# Altium PCB slave.PcbDoc (part 5 of 7)
Units mil, origin at the board's own origin, x right, y up, seen from the top; angles counter-clockwise.
Board outline 6299.21 x 3937.01 mil, 6 copper layers (Top Copper, FUSED_VBAT-, Signal Layer 2, Signal Layer 3, VREG, Bot Copper), stack 65.355 mil thick; 495 components, 307 nets, 1435 pads, 1866 vias.
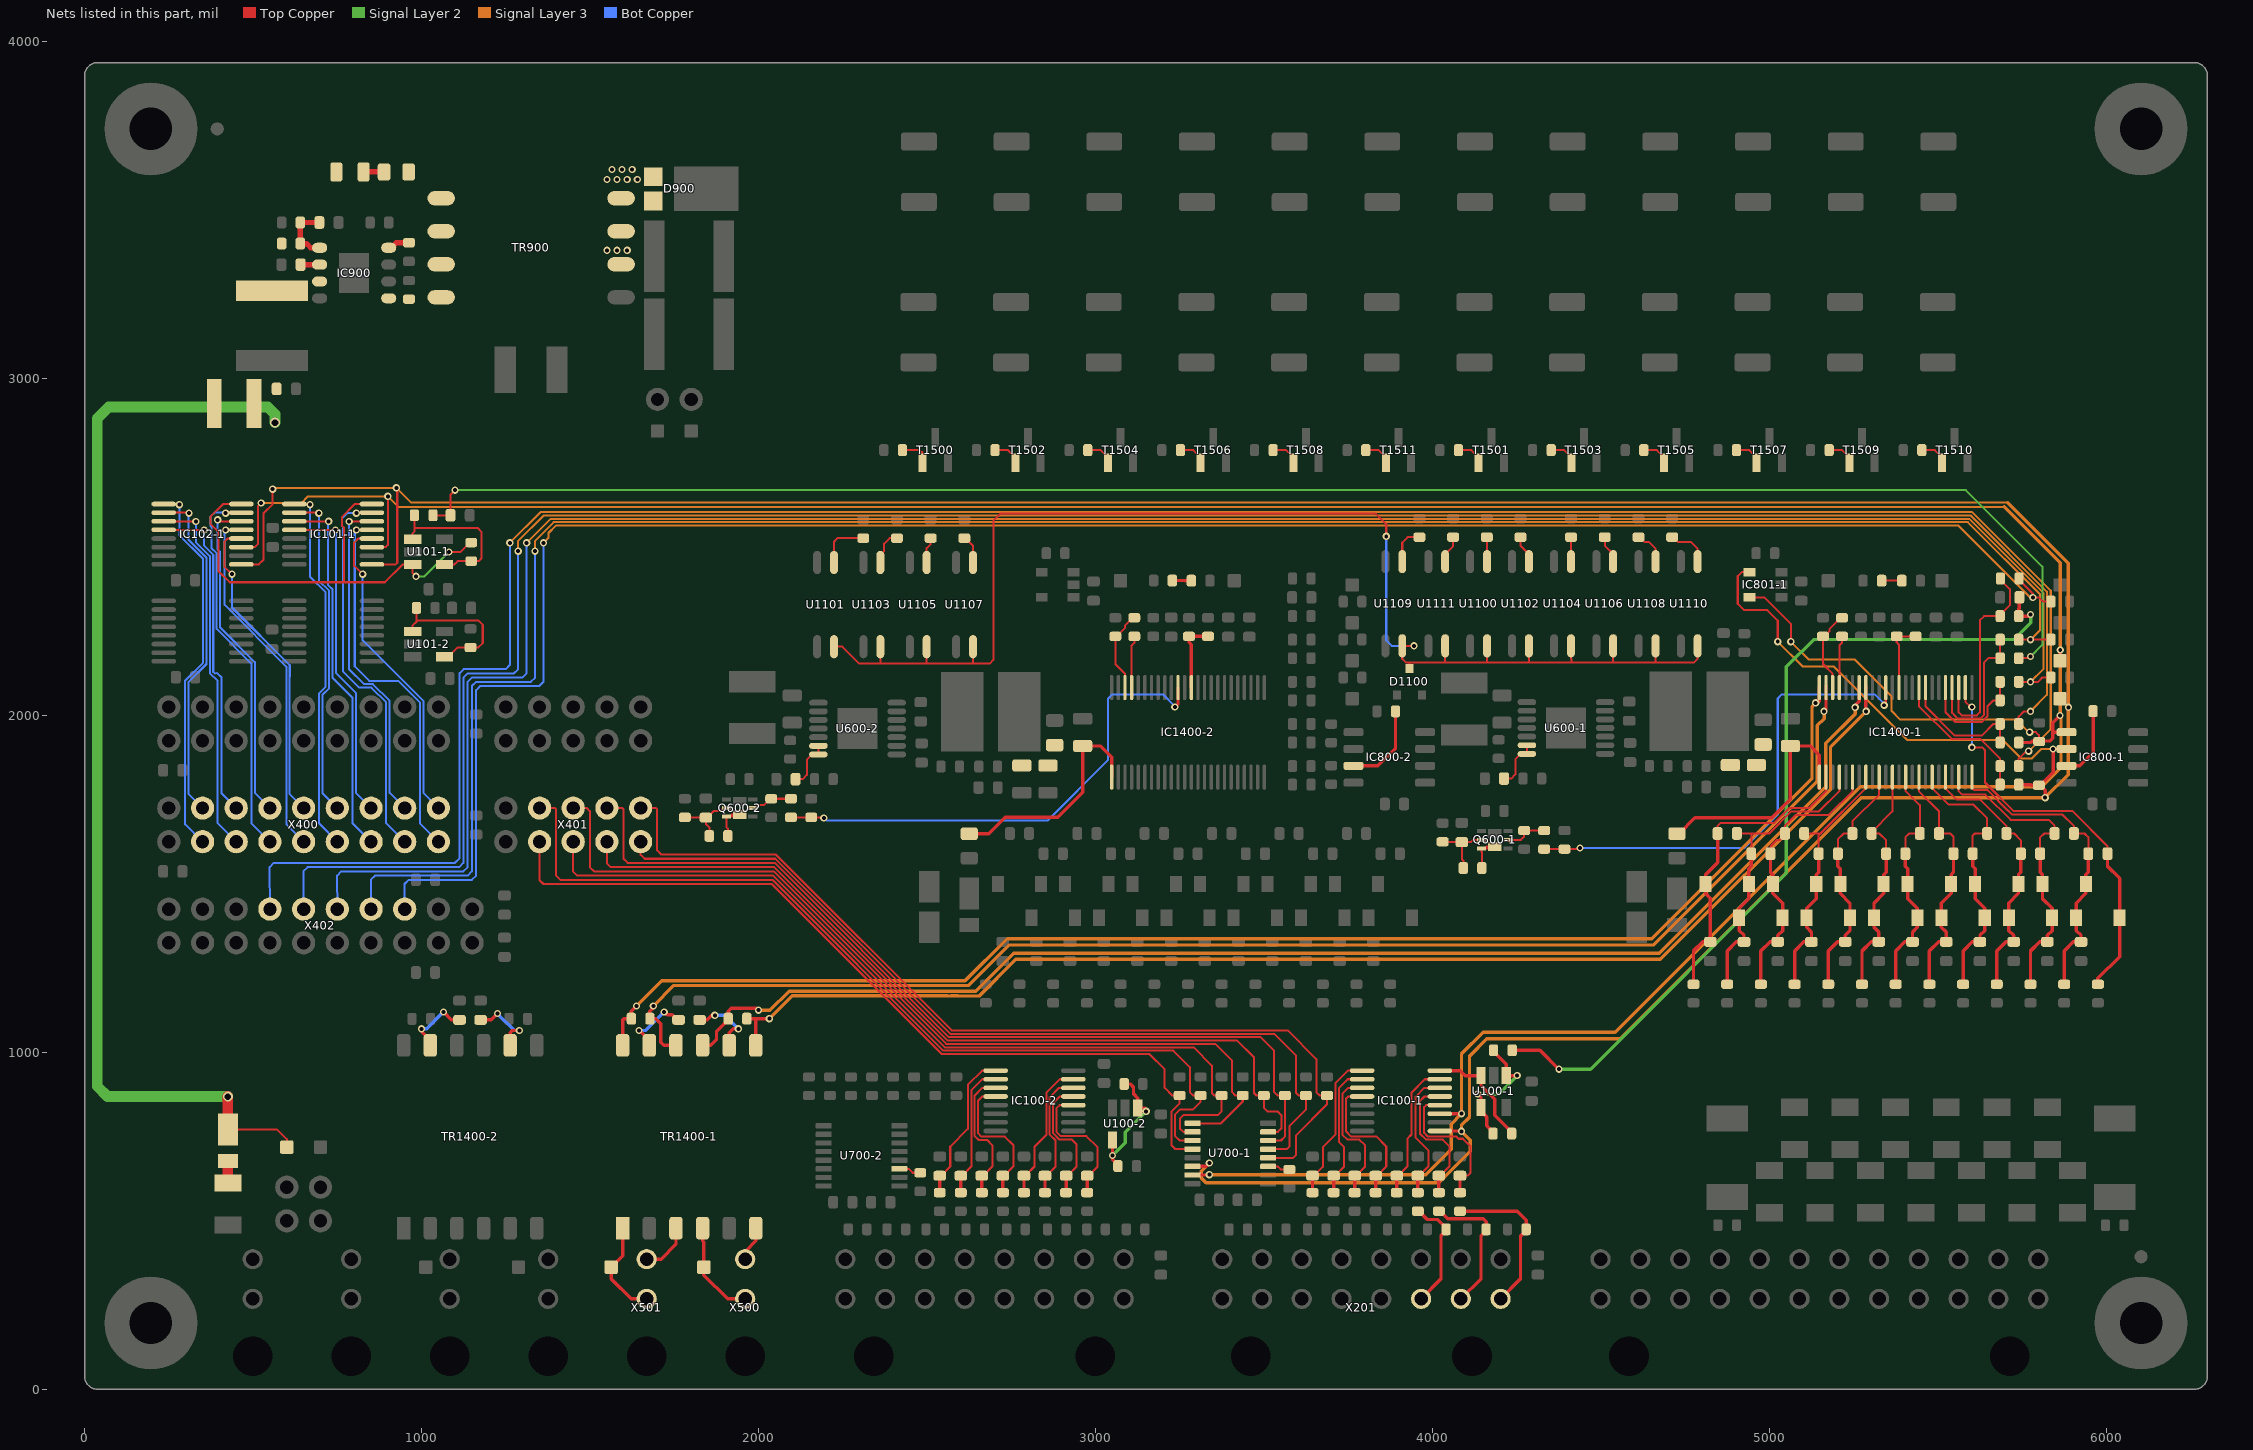
[diagram p8: the nets of this part, all layers, seen from the top]

## Via types
v1: diameter 21.65, hole 11.81, Top Copper to Bot Copper, tented both sides, 1848 vias
v2: diameter 35.43, hole 23.62, Top Copper to Bot Copper, 15 vias
v3: diameter 29.53, hole 19.68, Top Copper to Bot Copper, tented both sides, 3 vias

## Nets (pads, with @x,y where several pads share a name; then routed paths per layer and width w, separated by ;. In a path a pad name is that pad's centre, name@x,y a point inside that pad or via, vN(x,y) a via of type N, cw(c..) or ccw(c..) an arc to the next point about the centre after c; other vN are vias at no path point) (continued)
LTC-Drive_0: IC1400-1.38 R604-1.1 R605-1.2 | length 1477.9
  Top Copper w6: R604-1.1@4331.11,1603.1 4369.94,1603.1 R605-1.2@4391.66,1603.09 4434.34,1603.09 v1(4437.5,1606.25) ; v1(5340,2030) 5344.69,2034.69 IC1400-1.38@5344.69,2088.68
  Bot Copper w6: v1(4437.5,1606.25) 4924.73,1606.25 5024.21,1705.73 5024.21,2050 5036.71,2062.5 5312.5,2062.5 5340,2035 v1(5340,2030)
LTC-Drive_1: IC1400-2.38 R604-2.1 R605-2.2 | length 1483.3
  Top Copper w6: R604-2.1@2096.34,1697.44 2134.53,1697.44 R605-2.2@2156.25,1697.44 2191.93,1697.44 v1(2193.75,1695.62)
  Top Copper w10: v1(3235,2025) 3244.68,2034.68 IC1400-2.38@3244.68,2082.38
  Bot Copper w6: v1(2193.75,1695.62) 2201.87,1687.5 2857.35,1687.5 3037.5,1867.65 3037.5,2050 3050,2062.5 3200,2062.5 3235,2027.5 v1(3235,2025)
LTC-V+_0: C1400-1.1 IC1400-1.1 R1400-1.2 | length 747.5
  Top Copper w10: R1400-1.2@4725,1648.92 4731.89,1648.92 4778.59,1695.62 5005.91,1695.62 5061.71,1751.42 5061.71,1898.33 5050.88,1909.16 C1400-1.1@5061.71,1909.16 5120.84,1909.16 5147.83,1882.17 IC1400-1.1@5147.83,1816.64 IC1400-1.1@5147.83,1784.16
LTC-V+_1: C1400-2.1 IC1400-2.1 R1401-2.2 | length 683.7
  Top Copper w10: R1401-2.2@2625,1648.92 2682.63,1648.92 2731.65,1697.95 2887.67,1697.95 2961.71,1771.99 C1400-2.1@2961.71,1909.16 3014.1,1909.16 3047.83,1875.43 IC1400-2.1@3047.83,1816.64
NetC102-1_2: C102-1.2 IC100-1.4 R108-1.1 | length 443.1
  Top Copper w6: IC100-1.4@4021.41,843.45 3980.99,843.45 3975,837.46 3975,760.83 3984.94,750.89 4069.45,750.89 4076.69,743.64 4090.11,743.64 4112.5,721.25 4112.5,642.51 4103.95,633.96 C102-1.2@4081.25,633.96
  Top Copper w10: R108-1.1@4081.25,583.81 C102-1.2@4081.25,633.96
NetC102-2_2: C102-2.2 IC100-2.4 R108-2.1 | length 414.5
  Top Copper w6: IC100-2.4@2933.91,843.45 2893.49,843.45 2883.87,833.83 2883.87,764.21 2896.6,751.48 2972.66,751.48 3006.25,717.89 3006.25,661.27 2978.94,633.96 C102-2.2@2975,633.96
  Top Copper w10: R108-2.1@2975,583.81 C102-2.2@2975,633.96
NetC103-1_2: C103-1.2 IC100-1.5 R109-1.1 | length 416.9
  Top Copper w6: IC100-1.5@4021.41,869.05 3975.91,869.05 3962.5,855.64 3962.5,759.18 3980.8,740.89 4030.42,740.89 4050,721.31 4050,661.27 C103-1.2@4022.69,633.96
  Top Copper w10: R109-1.1@4018.75,583.81 C103-1.2@4018.75,633.96 C103-1.2@4022.69,633.96
NetC103-2_2: C103-2.2 IC100-2.5 R109-2.1 | length 399.4
  Top Copper w6: C103-2.2@2912.5,633.96 2916.44,633.96 2943.41,660.93 2943.41,727.58 2929.51,741.48 2892.46,741.48 2873.87,760.06 2873.87,849.42 2893.49,869.05 IC100-2.5@2933.91,869.05
  Top Copper w10: R109-2.1@2912.5,583.81 C103-2.2@2912.5,633.96
NetC104-1_2: C104-1.2 IC100-1.6 R110-1.1 | length 397.9
  Top Copper w6: C104-1.2@3960.19,633.96 3987.5,661.27 3987.5,709.42 3950,746.92 3950,868.81 3975.83,894.64 IC100-1.6@4021.41,894.64
  Top Copper w10: R110-1.1@3956.25,583.81 C104-1.2@3956.25,633.96 C104-1.2@3960.19,633.96
NetC104-2_2: C104-2.2 IC100-2.6 R110-2.1 | length 387.2
  Top Copper w6: C104-2.2@2850,633.96 2853.94,633.96 2881.25,661.27 2881.25,738.54 2863.87,755.92 2863.87,867.16 2891.34,894.64 IC100-2.6@2933.91,894.64
  Top Copper w10: R110-2.1@2850,583.81 C104-2.2@2850,633.96
NetC105-1_2: C105-1.2 IC100-1.7 R111-1.1 | length 417.6
  Top Copper w6: C105-1.2@3897.69,633.96 3925,661.27 3925,743.75 3937.5,756.25 3937.5,880.76 3976.97,920.23 IC100-1.7@4021.41,920.23
  Top Copper w10: R111-1.1@3893.75,583.81 C105-1.2@3893.75,633.96 C105-1.2@3897.69,633.96
NetC105-2_2: C105-2.2 IC100-2.7 R111-2.1 | length 422.7
  Top Copper w6: C105-2.2@2787.5,633.96 2791.44,633.96 2818.75,661.27 2818.75,719.64 2853.87,754.75 2853.87,880 2894.09,920.23 IC100-2.7@2933.91,920.23
  Top Copper w10: R111-2.1@2787.5,583.81 C105-2.2@2787.5,633.96
NetC106-1_2: C106-1.2 IC100-1.12 R112-1.1 | length 437.4
  Top Copper w6: IC100-1.12@3791.09,869.05 3750.3,869.05 3743.14,861.89 3743.14,765.47 3757.72,750.89 3832.32,750.89 3862.5,720.71 3862.5,661.27 C106-1.2@3835.19,633.96
  Top Copper w10: R112-1.1@3831.25,583.81 C106-1.2@3831.25,633.96 C106-1.2@3835.19,633.96
NetC106-2_2: C106-2.2 IC100-2.12 R112-2.1 | length 430.2
  Top Copper w6: IC100-2.12@2703.59,869.05 2663.18,869.05 2651.25,857.12 2651.25,760.23 2661.32,750.16 2731.09,750.16 2756.25,725 2756.25,661.27 2728.94,633.96 C106-2.2@2725,633.96
  Top Copper w10: R112-2.1@2725,583.81 C106-2.2@2725,633.96
NetC107-1_2: C107-1.2 IC100-1.11 R113-1.1 | length 422.8
  Top Copper w6: C107-1.2@3772.69,633.96 3800,661.27 3800,723.81 3782.92,740.89 3747.71,740.89 3732.5,756.09 3732.5,876.86 3750.27,894.64 IC100-1.11@3791.09,894.64
  Top Copper w10: R113-1.1@3768.75,583.81 C107-1.2@3768.75,633.96 C107-1.2@3772.69,633.96
NetC107-2_2: C107-2.2 IC100-2.11 R113-2.1 | length 411.6
  Top Copper w6: C107-2.2@2662.5,633.96 2666.44,633.96 2693.75,661.27 2693.75,724.11 2677.7,740.16 2652.57,740.16 2641.25,751.48 2641.25,871.94 2663.94,894.64 IC100-2.11@2703.59,894.64
  Top Copper w10: R113-2.1@2662.5,583.81 C107-2.2@2662.5,633.96
NetC108-1_2: C108-1.2 IC100-1.10 R114-1.1 | length 411.5
  Top Copper w6: C108-1.2@3710.19,633.96 3737.5,661.27 3737.5,718.75 3722.5,733.75 3722.5,894.74 3747.98,920.23 IC100-1.10@3791.09,920.23
  Top Copper w10: R114-1.1@3706.25,583.81 C108-1.2@3706.25,633.96 C108-1.2@3710.19,633.96
NetC108-2_2: C108-2.2 IC100-2.10 R114-2.1 | length 404.8
  Top Copper w6: C108-2.2@2600,633.96 2603.94,633.96 2631.25,661.27 2631.25,887.5 2663.98,920.23 IC100-2.10@2703.59,920.23
  Top Copper w10: R114-2.1@2600,583.81 C108-2.2@2600,633.96
NetC109-1_2: C109-1.2 IC100-1.9 R115-1.1 | length 450.3
  Top Copper w6: C109-1.2@3647.69,633.96 3674.21,660.48 3674.21,718.75 3712.5,757.04 3712.5,909.74 3748.57,945.82 IC100-1.9@3791.09,945.82
  Top Copper w10: R115-1.1@3643.75,583.81 C109-1.2@3643.75,633.96 C109-1.2@3647.69,633.96
NetC109-2_2: C109-2.2 IC100-2.9 R115-2.1 | length 456.8
  Top Copper w6: C109-2.2@2537.5,633.96 2541.44,633.96 2568.75,661.27 2568.75,720.23 2621.25,772.73 2621.25,903.98 2663.09,945.82 IC100-2.9@2703.59,945.82
  Top Copper w10: R115-2.1@2537.5,583.81 C109-2.2@2537.5,633.96
NetC600-1_2: C600-1.2 Q600-1.5 R600-1.1 R602-1.2 | length 197.4
  Top Copper w6: R600-1.1@4029.81,1624.9 4062.95,1624.9 4063.94,1623.92 C600-1.2@4086.64,1623.92 ; R602-1.2@4091.05,1546.91 4091.05,1568.62 4086.64,1573.04 C600-1.2@4086.64,1623.92 ; Q600-1.5@4145.18,1630.65 4120.38,1630.65 4113.64,1623.92 C600-1.2@4086.64,1623.92
NetC600-2_2: C600-2.2 Q600-2.5 R600-2.1 R602-2.2 | length 194
  Top Copper w6: R600-2.1@1781.25,1697.44 1820.07,1697.44 1821.05,1696.46 C600-2.2@1843.75,1696.46 ; R602-2.2@1853.69,1642.17 1853.69,1667.75 1843.75,1677.69 C600-2.2@1843.75,1696.46 ; Q600-2.5@1904.57,1725 1896.7,1725 1887.97,1716.26 1867.49,1716.26 1847.69,1696.46 C600-2.2@1843.75,1696.46
NetC604-1_1: C604-1.1 U600-1.6 U600-1.7 | length 150.1
  Top Copper w6: C604-1.1@4212.02,1812.47 4232.89,1812.47 4245.39,1824.97 4245.39,1869.95 4261.13,1885.7 U600-1.7@4279.83,1885.7 U600-1.6@4279.83,1911.29
NetC604-2_1: C604-2.1 U600-2.6 U600-2.7 | length 150.1
  Top Copper w6: C604-2.1@2109.69,1810.73 2130.56,1810.73 2143.06,1823.23 2143.06,1868.21 2158.81,1883.96 U600-2.7@2177.51,1883.96 U600-2.6@2177.51,1909.55
NetC607-1_2: C607-1.2 C608-1.2 R607-1.2
NetC607-2_2: C607-2.2 C608-2.2 R607-2.2
NetC902_1: C902.1 R900.2 | length 60.7
  Top Copper w16: C902.1@827.85,3612.5 R900.2@888.58,3612.5
NetC902_2: C902.2 C905.2 IC900.3 L900.2 R901.2 TR900.3 TR900.4
NetC904_1: C904.1 D901.2 L900.1 TP901.1 | length 3265.8
  Top Copper w6: D901.2@425,770.96 571.47,770.96 600,742.43 TP901.1@600,718.75
  Top Copper w32: D901.2@425,770.96 v3(425,868.75)
  Signal Layer 2 w32: v3(425,868.75) 68.26,868.75 37.5,899.51 37.5,2881.25 71.6,2915.35 543.4,2915.35 565,2893.75 v3(565,2868.75)
NetC906_2: C906.2 IC900.1 R901.1 R905.2 | length 181.6
  Top Copper w16: C906.2@696.46,3462.5 R905.2@640.06,3462.5 640.06,3421.72 R901.1@640.06,3400 658.58,3400 671.08,3387.5 IC900.1@697.58,3387.5
NetC907_2: C907.2 IC900.2 | length 56.5
  Top Copper w16: C907.2@641.04,3337.5 IC900.2@697.58,3337.5
NetC1404-1_2: C1404-1.2 TR1400-1.8 | length 206.8
  Top Copper w10: C1404-1.2@1825,1096.46 1847.7,1096.46 1861.24,1110 v1(1870,1110) ; TR1400-1.8@1912.9,1020.85 1912.9,1058.6 1924.3,1070 v1(1940,1070)
  Bot Copper w10: v1(1870,1110) 1900,1110 v1(1940,1070)
NetC1404-2_2: C1404-2.2 TR1400-2.8 | length 210.9
  Top Copper w10: C1404-2.2@1175,1096.46 1206.46,1096.46 v1(1225,1115) ; TR1400-2.8@1262.9,1020.85 1262.9,1058.6 1269.3,1065 v1(1290,1065)
  Bot Copper w10: v1(1225,1115) 1275,1065 v1(1290,1065)
NetC1405-1_2: C1405-1.2 TR1400-1.11 | length 207.3
  Top Copper w10: v1(1645,1065) 1645.5,1065 1675.9,1034.6 TR1400-1.11@1675.9,1020.85 ; v1(1720,1120) 1728.11,1111.89 1743.13,1111.89 1758.56,1096.46 C1405-1.2@1762.5,1096.46
  Bot Copper w10: v1(1645,1065) 1665,1065 v1(1720,1120)
NetC1405-2_2: C1405-2.2 TR1400-2.11 | length 202.8
  Top Copper w10: v1(1000,1070) 1000,1060.5 1025.9,1034.6 TR1400-2.11@1025.9,1020.85 ; v1(1065,1120) 1088.54,1096.46 C1405-2.2@1112.5,1096.46
  Bot Copper w10: v1(1000,1070) 1015,1070 v1(1065,1120)
NetD900_2: D900.2 D900.3 TR900.5
  other v1: 1550,3590 1580,3590 1610,3590 1640,3590 1565,3620 1595,3620 1625,3620
NetD901_1: D901.1 F900.2 | length 64.9
  Top Copper w32: F900.2@425,612.6 D901.1@425,677.46
NetD1100_3: D1100.3 U1100.4 U1101.4 U1102.4 U1103.4 U1104.4 U1105.4 U1106.4 U1107.4 U1108.4 U1109.4 U1110.4 U1111.4 | length 4001
  Top Copper w6: U1101.4@2223.81,2203.71 2248.32,2203.71 2298.32,2153.71 2361.31,2153.71 ; U1103.4@2361.31,2203.71 2361.31,2153.71 ; U1105.4@2498.81,2203.71 2498.81,2153.71 ; U1107.4@2636.31,2203.71 2636.31,2153.71 ; v1(3862.5,2531.25) 3862.5,2567.5 3831.28,2598.72 2717.86,2598.72 2696.71,2577.57 2696.71,2164.9 2685.52,2153.71 2636.31,2153.71 ; D1100.3@3931.25,2138.88 3931.25,2156.25 ; 3931.25,2156.66 3931.25,2156.25 ; v1(3944.89,2206.25) U1109.4@3910,2206.25 3910,2167.8 3921.55,2156.25 3931.25,2156.25 ; U1111.4@4037.5,2206.25 4037.5,2156.25 ; U1100.4@4161.71,2206.25 4161.71,2157.04 4162.5,2156.25 ; U1102.4@4285.92,2206.25 4285.92,2157.83 4287.5,2156.25 ; U1104.4@4410.83,2206.25 4410.83,2167.8 4412.5,2166.13 4412.5,2156.25 ; U1106.4@4535.92,2206.25 4535.92,2157.83 4537.5,2156.25 ; U1108.4@4661.71,2206.25 4661.71,2157.04 4662.5,2156.25 ; U1110.4@4786.61,2206.25 4786.61,2167.8 4775.06,2156.25 4662.5,2156.25 ; 2361.31,2153.71 2498.81,2153.71 ; 2498.81,2153.71 2636.31,2153.71 ; 3931.25,2156.25 3975,2156.25 4037.5,2156.25 ; 4037.5,2156.25 4162.5,2156.25 ; 4162.5,2156.25 4287.5,2156.25 ; 4287.5,2156.25 4412.5,2156.25 ; 4412.5,2156.25 4537.5,2156.25 ; 4537.5,2156.25 4662.5,2156.25
  Bot Copper w6: v1(3862.5,2531.25) 3862.5,2222.4 3878.65,2206.25 v1(3944.89,2206.25)
NetIC800-1_7: IC800-1.7 R800-1.1 | length 217.8
  Top Copper w10: IC800-1.7@5881.2,1850 5920,1850 5959.94,1889.94 R800-1.1@5959.94,2012.5
NetIC800-2_7: IC800-2.7 R800-2.1 | length 255.9
  Top Copper w10: IC800-2.7@3765.27,1850.25 3837.75,1850.25 3890.06,1902.56 R800-2.1@3890.06,2012.01
NetIC900_5: IC900.5 R900.1 R902.2 TR900.1 TR900.2
NetIC900_8: IC900.8 R903.1 | length 66.3
  Top Copper w16: IC900.8@902.42,3387.5 909.96,3387.5 925.02,3402.56 R903.1@962.5,3402.56
NetIC1400-1_45: IC1400-1.45 R1421-1.2 | length 147.1
  Top Copper w6: IC1400-1.45@5206.89,2088.68 5206.89,2207.19 5214.84,2215.13 R1421-1.2@5214.84,2232.48
NetIC1400-2_45: IC1400-2.45 R1421-2.2 | length 147.1
  Top Copper w6: IC1400-2.45@3106.89,2088.68 3106.89,2207.19 3114.84,2215.13 R1421-2.2@3114.84,2232.48
NetLD1400-1_1: LD1400-1.1 R1407-1.2 | length 59.9
  Top Copper w6: R1407-1.2@5332.56,2399.51 LD1400-1.1@5392.44,2399.51
NetLD1400-2_1: LD1400-2.1 R1406-2.2 | length 56.8
  Top Copper w10: R1406-2.2@3227.56,2400 3265.88,2400 3266.37,2399.51 LD1400-2.1@3284.15,2399.51
NetQ600-1_2: Q600-1.2 R604-1.2 R608-1.2 | length 120.2
  Top Copper w6: Q600-1.2@4223.53,1630.65 4262.07,1630.65 4271.86,1640.44 R608-1.2@4271.86,1658.22 R604-1.2@4321.86,1658.22
NetQ600-1_6: Q600-1.6 Q600-1.7 R602-1.1 | length 113.3
  Top Copper w6: R602-1.1@4145.18,1547.39 R602-1.1@4149.42,1543.16 ; R602-1.1@4146.17,1546.91 4146.17,1594.17 4145.18,1595.16 Q600-1.6@4145.18,1605.06 4162.96,1605.06 4160.67,1607.35 4160.67,1611.36 Q600-1.7@4184.35,1611.36
NetQ600-2_2: Q600-2.2 R604-2.2 R608-2.2 | length 124.8
  Top Copper w6: Q600-2.2@1982.92,1725 1990.79,1725 1999.53,1733.73 2014.73,1733.73 2033.56,1752.56 R608-2.2@2037.5,1752.56 R604-2.2@2096.34,1752.56
NetQ600-2_6: Q600-2.6 Q600-2.7 R602-2.1 | length 107.7
  Top Copper w6: R602-2.1@1908.81,1642.17 1908.81,1663.89 1904.57,1668.12 Q600-2.6@1904.57,1699.4 1922.35,1699.4 1922.35,1703.41 1920.06,1705.7 Q600-2.7@1943.75,1705.7
NetR116-1_1: R116-1.1 R117-1.2 U100-1.1 U100-1.4 | length 398.9
  Top Copper w10: v1(4133.86,876.2) 4143.86,866.21 U100-1.4@4143.86,836.62 4143.86,824.8 4160.47,808.2 4160.47,781.82 4179.49,762.8 R117-1.2@4179.49,758.86 ; R116-1.1@4180.92,1006.25 4180.92,1002.31 4218.66,964.57 U100-1.1@4218.66,931.1 v1(4250.83,931.1)
  Signal Layer 2 w10: v1(4133.86,876.2) 4195.93,876.2 v1(4250.83,931.1)
NetR116-2_1: R116-2.1 R117-2.2 U100-2.1 U100-2.4 | length 400.2
  Top Copper w10: U100-2.4@3050.1,752.07 U100-2.4@3050.1,740.26 v1(3050.1,693.75) 3050.1,682.53 3066.19,666.44 R117-2.2@3066.19,662.5 ; R116-2.1@3084.94,906.25 3102.75,906.25 3112.5,896.5 3112.5,876.74 3124.9,864.33 U100-2.1@3124.9,834.74 3146.51,834.74 3150,831.25 v1(3150,825)
  Signal Layer 2 w10: v1(3050.1,693.75) v1(3050.1,693.75) 3087.5,731.25 3087.5,762.5 v1(3150,825)
NetR118-1_1: R118-1.1 R119-1.2 U101-1.1 U101-1.4 | length 472.7
  Top Copper w6: U101-1.1@973.42,2522.4 973.42,2540.18 978.69,2545.45 R118-1.1@978.69,2593.75 ; 979.88,2556.63 1165.94,2556.25 1178.44,2543.75 1178.44,2466.87 1169.01,2457.44 R119-1.2@1147.29,2457.44 1107.34,2457.44 1097.5,2447.6 U101-1.4@1067.91,2447.6
NetR118-2_1: R118-2.1 R119-2.2 U101-2.1 U101-2.4 | length 462.1
  Top Copper w6: U101-2.1@973.42,2249.02 973.42,2266.8 984.94,2278.31 ; R118-2.1@984.94,2318.75 984.94,2278.31 ; U101-2.4@1067.91,2174.21 1079.72,2174.21 1107.12,2201.62 R119-2.2@1145,2201.62 1168.75,2201.62 1181.53,2214.4 1181.53,2268.75 1169.03,2281.25 987.88,2281.25 984.94,2278.31
NetR708-1_2: R708-1.2 U700-1.3 | length 66.5
  Top Copper w6: U700-1.3@3512.2,661.61 3539.83,661.61 3548.88,652.56 R708-1.2@3575,652.56
NetR708-2_2: R708-2.2 U700-2.3 | length 66.8
  Top Copper w6: U700-2.3@2417.66,654.37 2445.29,654.37 2456.9,642.76 R708-2.2@2479.67,642.76
NetR1100_2: R1100.2 U1100.1 | length 72.8
  Top Copper w6: R1100.2@4160.92,2528.69 4160.92,2495.49 4161.71,2494.7 U1100.1@4161.71,2456.25
NetR1101_2: R1101.2 U1101.1 | length 152.8
  Top Copper w6: U1101.1@2223.81,2453.71 2223.81,2515.61 2233.85,2525.66 R1101.2@2310.52,2525.66
NetR1102_2: R1102.2 U1102.1 | length 82.8
  Top Copper w6: R1102.2@4260.92,2528.69 4260.92,2503.89 4285.92,2478.89 U1102.1@4285.92,2456.25
NetR1103_2: R1103.2 U1103.1 | length 105.1
  Top Copper w6: U1103.1@2361.31,2453.71 2361.31,2476.35 2372.49,2487.53 2372.49,2509.35 2388.8,2525.66 R1103.2@2410.52,2525.66
NetR1104_2: R1104.2 U1104.1 | length 72.5
  Top Copper w6: U1104.1@4410.83,2456.25 4410.83,2494.7 4410.92,2494.79 R1104.2@4410.92,2528.69
NetR1105_2: R1105.2 U1105.1 | length 76.8
  Top Copper w6: U1105.1@2498.81,2453.71 2498.81,2496.17 2510.52,2507.88 R1105.2@2510.52,2525.66
NetR1106_2: R1106.2 U1106.1 | length 82.8
  Top Copper w6: R1106.2@4510.92,2528.69 4510.92,2503.89 4535.92,2478.89 U1106.1@4535.92,2456.25
NetR1107_2: R1107.2 U1107.1 | length 84.9
  Top Copper w6: R1107.2@2610.52,2525.66 2614.45,2525.66 2636.31,2503.81 U1107.1@2636.31,2453.71
NetR1108_2: R1108.2 U1108.1 | length 103.3
  Top Copper w6: R1108.2@4610.92,2528.69 4614.86,2528.69 4629.45,2514.1 4642.31,2514.1 4661.71,2494.7 U1108.1@4661.71,2456.25
NetR1109_2: R1109.2 U1109.1 | length 114
  Top Copper w6: U1109.1@3910,2456.25 3910,2512.78 3925.91,2528.69 R1109.2@3960.92,2528.69
NetR1110_2: R1110.2 U1110.1 | length 128.2
  Top Copper w6: R1110.2@4710.92,2528.69 4714.86,2528.69 4729.45,2514.1 4767.21,2514.1 4786.61,2494.7 U1110.1@4786.61,2456.25
NetR1111_2: R1111.2 U1111.1 | length 82.1
  Top Copper w6: U1111.1@4037.5,2456.25 4037.5,2478.89 4060.92,2502.31 R1111.2@4060.92,2528.69
NetR1500_1: R1500.1 T1500.1 | length 94
  Top Copper w6: R1500.1@2426.77,2787.01 2477.99,2787.01 2483.83,2781.17 2486.81,2781.17 T1500.1@2486.81,2749.61
NetR1501_1: R1501.1 T1501.1 | length 84.8
  Top Copper w6: R1501.1@4076.77,2787.01 4115.15,2787.01 4136.81,2765.36 T1501.1@4136.81,2749.61
NetR1506_1: R1506.1 T1502.1 | length 84.8
  Top Copper w6: R1506.1@2701.77,2787.01 2740.15,2787.01 2761.81,2765.36 T1502.1@2761.81,2749.61
NetR1507_1: R1507.1 T1503.1 | length 84.8
  Top Copper w6: R1507.1@4351.77,2787.01 4390.15,2787.01 4411.81,2765.36 T1503.1@4411.81,2749.61
NetR1512_1: R1512.1 T1504.1 | length 84.8
  Top Copper w6: R1512.1@2976.77,2787.01 3015.15,2787.01 3036.81,2765.36 T1504.1@3036.81,2749.61
NetR1513_1: R1513.1 T1505.1 | length 84.8
  Top Copper w6: R1513.1@4626.77,2787.01 4665.15,2787.01 4686.81,2765.36 T1505.1@4686.81,2749.61
NetR1518_1: R1518.1 T1506.1 | length 84.8
  Top Copper w6: R1518.1@3251.77,2787.01 3290.15,2787.01 3311.81,2765.36 T1506.1@3311.81,2749.61
NetR1519_1: R1519.1 T1507.1 | length 84.8
  Top Copper w6: R1519.1@4901.77,2787.01 4940.15,2787.01 4961.81,2765.36 T1507.1@4961.81,2749.61
NetR1524_1: R1524.1 T1508.1 | length 84.8
  Top Copper w6: R1524.1@3526.77,2787.01 3565.15,2787.01 3586.81,2765.36 T1508.1@3586.81,2749.61
NetR1525_1: R1525.1 T1509.1 | length 84.8
  Top Copper w6: R1525.1@5176.77,2787.01 5215.15,2787.01 5236.81,2765.36 T1509.1@5236.81,2749.61
NetR1530_1: R1530.1 T1510.1 | length 84.8
  Top Copper w6: R1530.1@5451.77,2787.01 5490.15,2787.01 5511.81,2765.36 T1510.1@5511.81,2749.61
NetR1531_1: R1531.1 T1511.1 | length 84.8
  Top Copper w6: R1531.1@3801.77,2787.01 3840.15,2787.01 3861.81,2765.36 T1511.1@3861.81,2749.61
NetTR900_6: TR900.6 TR900.7
  other v1: 1550,3380 1580,3380 1610,3380
PRIMARY-ANALOG-IN_0: IC101-1.4 X400.1 | length 948.7
  Top Copper w6: v1(825,2418.75) 800,2443.75 800,2512.46 812.24,2524.7 IC101-1.4@852.66,2524.7
  Bot Copper w6: v1(825,2418.75) 825,2222.76 1005,2042.76 1005,1769.99 X400.1@1049.99,1725
PRIMARY-ANALOG-IN_1: IC101-1.5 X400.2 | length 1127
  Top Copper w6: v1(806.25,2550) 806.55,2550.3 IC101-1.5@852.66,2550.3
  Bot Copper w6: v1(806.25,2550) 806.25,2545.76 801.71,2541.22 801.71,2145.37 844.56,2102.52 931.1,2102.52 995,2038.62 995,1679.99 X400.2@1049.99,1625
PRIMARY-ANALOG-IN_2: IC101-1.6 X400.3 | length 1001.9
  Top Copper w6: v1(785,2575) 785.89,2575.89 IC101-1.6@852.66,2575.89
  Bot Copper w6: v1(785,2575) 784.42,2574.42 784.42,2137.65 829.56,2092.52 855.24,2092.52 905,2042.76 905,1770 X400.3@950,1725
PRIMARY-ANALOG-IN_3: IC101-1.7 X400.4 | length 1153.4
  Top Copper w6: v1(806.25,2600) 807.75,2601.5 IC101-1.7@851.5,2601.5
  Bot Copper w6: v1(806.25,2600) 779.13,2600 763.17,2584.04 763.17,2562.69 766.53,2559.34 766.53,2130.55 814.56,2082.52 851.1,2082.52 895,2038.62 895,1680 X400.4@950,1625
PRIMARY-ANALOG-IN_4: IC101-1.12 X400.5 | length 991.3
  Top Copper w6: IC101-1.12@622.34,2550.3 v1(744.7,2550.3)
  Bot Copper w6: v1(744.7,2550.3) 745.58,2549.42 745.58,2126.5 806,2066.08 806,1769 X400.5@850,1725
PRIMARY-ANALOG-IN_5: IC101-1.11 X400.6 | length 1105.8
  Top Copper w6: IC101-1.11@622.34,2575.89 v1(724.11,2575.89)
  Bot Copper w6: v1(724.11,2575.89) 722.88,2574.65 722.88,2386.27 735.58,2373.58 735.58,2111.5 795,2052.08 795,1680 X400.6@850,1625
PRIMARY-ANALOG-IN_6: IC101-1.10 X400.7 | length 986.1
  Top Copper w6: IC101-1.10@623.5,2601.5 693.5,2601.5 v1(695,2600)
  Bot Copper w6: v1(695,2600) 695,2400.01 725.58,2369.43 725.58,2080.78 706,2061.21 706,1769 X400.7@750,1725
PRIMARY-ANALOG-IN_7: IC101-1.9 X400.8 | length 1097.1
  Top Copper w6: IC101-1.9@622.34,2627.07 666.68,2627.07 v1(668.75,2625)
  Bot Copper w6: v1(668.75,2625) 668.75,2412.12 715.58,2365.29 715.58,2084.93 696,2065.35 696,1679 X400.8@750,1625
PRIMARY-ANALOG-IN_8: IC102-1.4 X400.9 | length 941.7
  Top Copper w6: v1(437.5,2418.75) 415.04,2441.21 415.04,2515 424.74,2524.7 IC102-1.4@465.16,2524.7
  Bot Copper w6: v1(437.5,2418.75) 437.5,2320.01 608.83,2148.68 608.83,2115.82 608.55,2115.54 608.55,1766.45 X400.9@650,1725
PRIMARY-ANALOG-IN_9: IC102-1.5 X400.10 | length 1070.1
  Top Copper w6: v1(418.75,2550) 424.44,2550 424.74,2550.3 IC102-1.5@465.16,2550.3
  Bot Copper w6: v1(418.75,2550) 418.75,2545.76 415.67,2542.69 415.67,2327.69 598.83,2144.54 598.83,2119.96 598.55,2119.68 598.55,1676.45 X400.10@650,1625
PRIMARY-ANALOG-IN_10: IC102-1.6 X400.11 | length 991.1
  Top Copper w6: v1(395,2580) 399.11,2575.89 IC102-1.6@465.16,2575.89
  Bot Copper w6: v1(395,2580) 395,2491.58 401.83,2484.75 401.83,2261.06 505,2157.88 505,1770 X400.11@550,1725
PRIMARY-ANALOG-IN_11: IC102-1.7 X400.12 | length 1134.8
  Top Copper w6: v1(418.75,2600) 420.25,2601.5 IC102-1.7@464,2601.5
  Bot Copper w6: v1(418.75,2600) 416.92,2601.83 385.96,2601.83 373.17,2589.04 373.17,2562.69 376.53,2559.34 376.53,2495.9 391.83,2480.61 391.83,2256.91 495,2153.74 495,1680 X400.12@550,1625
PRIMARY-ANALOG-IN_12: IC102-1.12 X400.13 | length 989.1
  Top Copper w6: IC102-1.12@234.84,2550.3 v1(354.7,2550.3)
  Bot Copper w6: v1(354.7,2550.3) 354.7,2503.59 381.83,2476.47 381.83,2129.39 386.71,2124.51 393.29,2124.98 406.25,2112.49 406.25,1768.75 X400.13@450,1725
PRIMARY-ANALOG-IN_13: IC102-1.11 X400.14 | length 1095.2
  Top Copper w6: IC102-1.11@234.84,2575.89 329.11,2575.89 v1(330,2575)
  Bot Copper w6: v1(330,2575) 330,2514.15 371.83,2472.33 371.83,2125.25 395,2102.08 395,1680 X400.14@450,1625
PRIMARY-ANALOG-IN_14: IC102-1.10 X400.15 | length 1011.8
  Top Copper w6: IC102-1.10@236,2601.5 308.5,2601.5 v1(310,2600)
  Bot Copper w6: v1(310,2600) 308.17,2598.17 308.17,2521.84 361.83,2468.18 361.83,2152.46 308.55,2099.19 308.55,1766.45 X400.15@350,1725
PRIMARY-ANALOG-IN_15: IC102-1.9 X400.16 | length 1119.9
  Top Copper w6: IC102-1.9@234.84,2627.07 275.26,2627.07 277.33,2625 v1(281.25,2625)
  Bot Copper w6: v1(281.25,2625) 281.25,2534.62 351.83,2464.04 351.83,2156.61 298.55,2103.33 298.55,1676.45 X400.16@350,1625
PRIMARY-C0: C1322-1.2 IC1400-1.26 R1312-1.2 Z1310-1.2 | length 1219
  Top Copper w6: IC1400-1.26@5580.9,2082.38 5580.9,2040.98 5596.89,2025 v1(5600,2025) ; v1(5600,1905) 5631.22,1905 5639.21,1897.01 5639.21,1800.79 5724.33,1715.67 5899.04,1715.67 6002.75,1611.96 C1322-1.2@6002.75,1589.51 C1322-1.2@6002.75,1574.51
  Top Copper w10: R1312-1.2@5974.21,1202.07 5974.21,1219.85 6038.58,1284.22 Z1310-1.2@6038.58,1399.51 6038.58,1515.98 6002.75,1551.81 C1322-1.2@6002.75,1574.51
  Bot Copper w6: v1(5600,1905) v1(5600,2025)
PRIMARY-C1: C1318-1.2 C1320-1.1 C1322-1.1 IC1400-1.24 R1310-1.2 Z1308-1.2 Z1310-1.1 | length 942.3
  Top Copper w6: IC1400-1.24@5600.59,1816.64 5600.59,1784.16 5606.9,1777.85 5647.15,1777.85 5707.5,1717.5 5708.36,1717.5 5720.18,1705.67 5869.29,1705.67 5902.75,1672.21 C1318-1.2@5902.75,1649.51 5934.51,1649.51 5945.67,1638.35 C1322-1.1@5945.67,1589.51
  Top Copper w10: R1310-1.2@5874.21,1202.07 5874.21,1300.75 5901.51,1328.05 C1320-1.1@5924.21,1328.05 5924.21,1346.82 5909.84,1361.19 Z1310-1.1@5909.84,1399.51 5909.84,1442.75 5938.58,1471.49 Z1308-1.2@5938.58,1499.51 5938.58,1527.53 5945.67,1534.61 C1322-1.1@5945.67,1589.51
PRIMARY-C2: C1314-1.2 C1316-1.1 C1318-1.1 IC1400-1.22 R1308-1.2 Z1306-1.2 Z1308-1.1 | length 929.5
  Top Copper w6: IC1400-1.22@5561.22,1816.64 5561.22,1775.23 5571.45,1765 5640,1765 5715,1690 5827.88,1690 5845.67,1672.21 C1318-1.1@5845.67,1649.51 5814.51,1649.51 5802.75,1637.75 C1314-1.2@5802.75,1589.51
  Top Copper w10: R1308-1.2@5774.21,1202.07 5774.21,1300.75 5801.51,1328.05 C1316-1.1@5824.21,1328.05 5824.21,1346.82 5838.58,1361.19 Z1306-1.2@5838.58,1399.51 5838.58,1427.53 5809.84,1456.27 Z1308-1.1@5809.84,1499.51 5809.84,1527.53 5802.75,1534.61 C1314-1.2@5802.75,1589.51
PRIMARY-C3: C1310-1.2 C1312-1.1 C1314-1.1 IC1400-1.20 R1306-1.2 Z1304-1.2 Z1306-1.1 | length 815.8
  Top Copper w6: IC1400-1.20@5521.85,1816.64 5521.85,1784.16 5556,1750 5624.96,1750 5702.75,1672.21 C1310-1.2@5702.75,1649.51 5725.49,1649.51 5745.67,1629.33 C1314-1.1@5745.67,1589.51
  Top Copper w10: R1306-1.2@5674.21,1202.07 5674.21,1300.75 5701.51,1328.05 C1312-1.1@5724.21,1328.05 5724.21,1346.82 5709.84,1361.19 Z1306-1.1@5709.84,1399.51 5709.84,1442.75 5738.58,1471.49 Z1304-1.2@5738.58,1499.51 5738.58,1527.53 5745.67,1534.61 C1314-1.1@5745.67,1589.51
PRIMARY-C4: C1306-1.2 C1308-1.1 C1310-1.1 IC1400-1.18 R1304-1.2 Z1302-1.2 Z1304-1.1 | length 818.9
  Top Copper w6: IC1400-1.18@5482.48,1816.64 5482.48,1784.16 5531.63,1735 5605,1735 5645.67,1694.33 C1310-1.1@5645.67,1649.51 5609.51,1649.51 5602.75,1642.75 C1306-1.2@5602.75,1589.51
  Top Copper w10: R1304-1.2@5574.21,1202.07 5574.21,1300.75 5601.51,1328.05 C1308-1.1@5624.21,1328.05 5624.21,1346.82 5638.58,1361.19 Z1302-1.2@5638.58,1399.51 5638.58,1427.53 5609.84,1456.27 Z1304-1.1@5609.84,1499.51 5609.84,1544.72 5602.75,1551.81 C1306-1.2@5602.75,1589.51
PRIMARY-C5: C1302-1.2 C1304-1.1 C1306-1.1 IC1400-1.16 R1302-1.2 Z1300-1.2 Z1302-1.1 | length 731
  Top Copper w6: IC1400-1.16@5443.11,1816.64 5443.11,1775.23 5502.75,1715.59 C1302-1.2@5502.75,1649.51 5535.49,1649.51 5545.67,1639.33 C1306-1.1@5545.67,1589.51
  Top Copper w10: R1302-1.2@5474.21,1202.07 5474.21,1300.75 5501.51,1328.05 C1304-1.1@5524.21,1328.05 5524.21,1357.12 5509.84,1371.49 Z1302-1.1@5509.84,1399.51 5509.84,1442.75 5538.58,1471.49 Z1300-1.2@5538.58,1499.51 5538.58,1527.53 5545.67,1534.61 C1306-1.1@5545.67,1589.51
PRIMARY-C6: C1300-1.1 C1302-1.1 C1323-1.2 IC1400-1.14 R1300-1.2 Z1300-1.1 Z1311-1.2 | length 722.8
  Top Copper w6: C1323-1.2@5402.75,1589.51 5402.75,1637.75 5414.51,1649.51 C1302-1.1@5445.67,1649.51 5445.67,1733.31 5403.74,1775.23 IC1400-1.14@5403.74,1816.64
  Top Copper w10: R1300-1.2@5374.21,1202.07 5374.21,1300.75 5401.51,1328.05 C1300-1.1@5424.21,1328.05 5424.21,1357.12 5438.58,1371.49 Z1311-1.2@5438.58,1399.51 5438.58,1427.53 5409.84,1456.27 Z1300-1.1@5409.84,1499.51 5409.84,1544.72 5402.75,1551.81 C1323-1.2@5402.75,1589.51
PRIMARY-C7: C1319-1.2 C1321-1.1 C1323-1.1 IC1400-1.12 R1311-1.2 Z1309-1.2 Z1311-1.1 | length 726
  Top Copper w6: C1323-1.1@5345.67,1589.51 5345.67,1629.33 5325.49,1649.51 C1319-1.2@5302.75,1649.51 5302.75,1653.45 5364.37,1715.06 IC1400-1.12@5364.37,1816.64
  Top Copper w10: R1311-1.2@5274.21,1202.07 5274.21,1300.75 5301.51,1328.05 C1321-1.1@5324.21,1328.05 5324.21,1357.12 5309.84,1371.49 Z1311-1.1@5309.84,1399.51 5309.84,1442.75 5338.58,1471.49 Z1309-1.2@5338.58,1499.51 5338.58,1527.53 5345.67,1534.61 C1323-1.1@5345.67,1589.51
PRIMARY-C8: C1315-1.2 C1317-1.1 C1319-1.1 IC1400-1.10 R1309-1.2 Z1307-1.2 Z1309-1.1 | length 735.3
  Top Copper w6: C1315-1.2@5202.75,1589.51 5202.75,1632.75 5219.51,1649.51 C1319-1.1@5245.67,1649.51 5245.67,1685.67 5325,1765 IC1400-1.10@5325,1816.64
  Top Copper w10: R1309-1.2@5174.21,1202.07 5174.21,1300.75 5201.51,1328.05 C1317-1.1@5224.21,1328.05 5224.21,1346.82 5238.58,1361.19 Z1307-1.2@5238.58,1399.51 5238.58,1442.75 5209.84,1471.49 Z1309-1.1@5209.84,1499.51 5209.84,1544.72 5202.75,1551.81 C1315-1.2@5202.75,1589.51
PRIMARY-C9: C1311-1.2 C1313-1.1 C1315-1.1 IC1400-1.8 R1307-1.2 Z1305-1.2 Z1307-1.1 | length 775.6
  Top Copper w6: C1311-1.2@5102.75,1649.51 5150.98,1649.51 ; C1315-1.1@5145.67,1589.51 5145.67,1644.2 5150.98,1649.51 ; IC1400-1.8@5285.63,1816.64 5285.63,1784.16 5150.98,1649.51
  Top Copper w10: R1307-1.2@5074.21,1202.07 5074.21,1300.75 5101.51,1328.05 C1313-1.1@5124.21,1328.05 5124.21,1357.12 5109.84,1371.49 Z1307-1.1@5109.84,1399.51 5109.84,1427.53 5138.58,1456.27 Z1305-1.2@5138.58,1499.51 5138.58,1527.53 5145.67,1534.61 C1315-1.1@5145.67,1589.51
PRIMARY-C10: C1307-1.2 C1309-1.1 C1311-1.1 IC1400-1.6 R1305-1.2 Z1303-1.2 Z1305-1.1 | length 833
  Top Copper w6: C1307-1.2@5002.75,1589.51 5002.75,1612.21 5020.69,1630.14 5030.24,1630.14 5045.67,1645.57 C1311-1.1@5045.67,1649.51 5045.67,1672.21 5078.46,1705 5176.02,1705 5246.26,1775.23 IC1400-1.6@5246.26,1816.64
  Top Copper w10: R1305-1.2@4974.21,1202.07 4974.21,1300.75 5001.51,1328.05 C1309-1.1@5024.21,1328.05 5024.21,1346.82 5038.58,1361.19 Z1303-1.2@5038.58,1399.51 5038.58,1442.75 5009.84,1471.49 Z1305-1.1@5009.84,1499.51 5009.84,1527.53 5002.75,1534.61 C1307-1.2@5002.75,1589.51
PRIMARY-C11: C1303-1.2 C1305-1.1 C1307-1.1 IC1400-1.4 R1303-1.2 Z1301-1.2 Z1303-1.1 | length 900.6
  Top Copper w6: C1303-1.2@4902.75,1649.51 4943.75,1649.51 ; C1307-1.1@4945.67,1589.51 4945.67,1647.59 4943.75,1649.51 ; IC1400-1.4@5206.89,1816.64 5206.89,1775.23 5146.65,1715 5064.21,1715 4998.72,1649.51 4943.75,1649.51
  Top Copper w10: R1303-1.2@4874.21,1202.07 4874.21,1300.75 4901.51,1328.05 C1305-1.1@4924.21,1328.05 4924.21,1346.82 4909.84,1361.19 Z1303-1.1@4909.84,1399.51 4909.84,1427.53 4938.58,1456.27 Z1301-1.2@4938.58,1499.51 4938.58,1544.72 4945.67,1551.81 C1307-1.1@4945.67,1589.51
PRIMARY-C12: C1301-1.1 C1303-1.1 IC1400-1.2 R1301-1.2 Z1301-1.1 | length 930.9
  Top Copper w6: C1303-1.1@4845.67,1649.51 4845.67,1672.21 4854.71,1681.25 5014.2,1681.25 5057.95,1725 5117.28,1725 5167.52,1775.23 IC1400-1.2@5167.52,1816.64
  Top Copper w10: R1301-1.2@4774.21,1202.07 4774.21,1300.75 4801.51,1328.05 C1301-1.1@4824.21,1328.05 4824.21,1457.12 4809.84,1471.49 Z1301-1.1@4809.84,1499.51 4809.84,1527.53 4845.67,1563.35 C1303-1.1@4845.67,1649.51
PRIMARY-DIGITAL-IO_0: R700-1.1 U700-1.4 X401.1 | length 2818.5
  Top Copper w6: X401.1@1650,1725 1695,1725 1699.21,1720.79 1699.21,1599.51 1711.71,1587.01 2051.18,1587.01 2573.19,1065 3569.6,1065 3655,979.6 3655,881.94 3664.99,871.95 R700-1.1@3686.71,871.95 3686.71,845.43 3595,753.72 3595,696.25 3585.95,687.2 U700-1.4@3512.2,687.2
PRIMARY-DIGITAL-IO_1: R701-1.1 U700-1.5 X401.2 | length 2611.3
  Top Copper w6: X401.2@1650,1625 1650,1586.22 1661.71,1574.51 2049.54,1574.51 2569.05,1055 3530,1055 3595,990 3595,879.44 3602.49,871.95 R701-1.1@3624.21,871.95 3624.21,830.21 3575.79,781.79 3575.79,721.46 3567.13,712.8 U700-1.5@3512.2,712.8
PRIMARY-DIGITAL-IO_2: R702-1.1 U700-1.6 X401.3 | length 2699.1
  Top Copper w6: X401.3@1550,1725 1595,1725 1599.21,1720.79 1599.21,1574.51 1611.71,1562.01 2047.89,1562.01 2564.9,1045 3490,1045 3530,1005 3530,881.94 3539.99,871.95 R702-1.1@3561.71,871.95 3561.71,750 3550.1,738.39 U700-1.6@3512.2,738.39
PRIMARY-DIGITAL-IO_3: R703-1.1 U700-1.7 X401.4 | length 2540.3
  Top Copper w6: X401.4@1550,1625 1550,1561.22 1561.71,1549.51 2046.25,1549.51 2560.76,1035 3419.97,1035 3470,984.97 3470,879.44 3477.49,871.95 R703-1.1@3499.21,871.95 3499.21,835.79 3510,825 3539.83,825 3551.19,813.64 3551.19,774.15 3541.01,763.98 U700-1.7@3512.2,763.98
PRIMARY-DIGITAL-IO_4: R704-1.1 U700-1.9 X401.5 | length 2685.4
  Top Copper w6: X401.5@1450,1725 1490,1725 1499.21,1715.79 1499.21,1549.51 1511.71,1537.01 2044.61,1537.01 2556.62,1025 3354.97,1025 3405,974.97 3405,881.94 3414.99,871.95 R704-1.1@3436.71,871.95 3436.71,854.17 3372.11,789.57 U700-1.9@3287.8,789.57
PRIMARY-DIGITAL-IO_5: R705-1.1 U700-1.10 X401.6 | length 2586.7
  Top Copper w6: X401.6@1450,1625 1450,1536.22 1461.71,1524.51 2042.97,1524.51 2552.48,1015 3290.87,1015 3345,960.87 3345,879.44 3352.49,871.95 R705-1.1@3374.21,871.95 3374.21,825 3363.54,814.33 3261.71,814.33 3250,802.62 3250,774.15 3260.17,763.98 U700-1.10@3287.8,763.98
PRIMARY-DIGITAL-IO_6: R706-1.1 U700-1.11 X401.7 | length 2704.2
  Top Copper w6: X401.7@1350,1725 1395,1725 1399.21,1720.79 1399.21,1524.51 1411.71,1512.01 2041.33,1512.01 2548.34,1005 3230.87,1005 3280,955.87 3280,881.94 3289.99,871.95 R706-1.1@3311.71,871.95 3311.71,853.91 3287.8,830 3250,830 3236.23,816.23 3236.23,751.48 3249.32,738.39 U700-1.11@3287.8,738.39
PRIMARY-DIGITAL-IO_7: R707-1.1 U700-1.12 X401.8 | length 2535.1
  Top Copper w6: X401.8@1350,1625 1350,1511.22 1361.71,1499.51 2039.68,1499.51 2544.19,995 3159.97,995 3205,949.97 3205,894.44 3227.49,871.95 R707-1.1@3249.21,871.95 3249.21,848.46 3225,824.25 3225,725 3237.2,712.8 U700-1.12@3287.8,712.8
PRIMARY-GPIO1: IC1400-1.27 R1405-1.2 R1406-1.2 | length 621.4
  Top Copper w6: IC1400-1.27@5561.22,2088.68 5561.22,2008.78 5570,2000 5615,2000 5624.21,2009.21 5624.21,2282.01 5636.71,2294.51 R1406-1.2@5682.19,2294.51 ; R1406-1.2@5684.15,2294.51 5684.15,2298.45 5712.8,2327.1 5712.8,2374.45 5684.94,2402.31 R1405-1.2@5684.94,2406.25
PRIMARY-GPIO1-OPT: R1404-1.1 R1405-1.1 X402.5 | length 6140.1
  Top Copper w6: R1405-1.1@5740.06,2406.25 5740.06,2402.31 5774.21,2368.16 5781.25,2361.12 v1(5781.25,2349.51) 5799.9,2349.51 5811.91,2337.5 R1404-1.1@5834.94,2337.5
  Signal Layer 3 w6: v1(1361.71,2512.01) 1376.71,2527.01 1376.71,2541.15 1398.63,2563.08 5560.64,2563.08 5774.21,2349.51 v1(5781.25,2349.51)
  Bot Copper w6: X402.5@950,1425 949.21,1499.51 961.71,1512.01 1149.21,1512.01 1161.71,1524.51 1161.71,2074.51 1174.21,2087.01 1349.21,2087.01 1361.71,2099.51 v1(1361.71,2512.01)
PRIMARY-GPIO2: IC1400-1.28 R1409-1.2 R1410-1.2 | length 449.6
  Top Copper w6: IC1400-1.28@5541.54,2088.68 5541.54,2007.19 5549.21,1999.51 5558.72,1990 5625,1990 5636.71,2001.71 5636.71,2157.01 5649.21,2169.51 R1410-1.2@5682.19,2169.51 ; R1410-1.2@5684.15,2169.51 R1409-1.2@5684.15,2224.51
PRIMARY-GPIO2-OPT: R1408-1.1 R1409-1.1 X402.7 | length 6369.1
  Top Copper w6: R1409-1.1@5741.24,2224.51 v1(5774.21,2224.51) 5774.7,2225 R1408-1.1@5834.94,2225
  Signal Layer 3 w6: v1(1336.71,2487.01) 1336.71,2517.88 1391.91,2573.08 5588.55,2573.08 5803.08,2358.55 5803.08,2253.38 v1(5774.21,2224.51)
  Bot Copper w6: X402.7@850,1425 849.21,1512.01 861.71,1524.51 1136.71,1524.51 1149.21,1537.01 1149.21,2087.01 1161.71,2099.51 1324.21,2099.51 1336.71,2112.01 v1(1336.71,2487.01)
PRIMARY-GPIO3: IC1400-1.29 R1412-1.2 R1413-1.2 | length 346
  Top Copper w6: IC1400-1.29@5521.85,2082.38 5521.85,2009.89 5551.73,1980 5629.14,1980 5646.71,1997.57 5646.71,2026.71 5664.51,2044.51 R1413-1.2@5684.15,2044.51 R1412-1.2@5684.15,2099.51
PRIMARY-GPIO3-OPT: R1411-1.1 R1412-1.1 X402.9 | length 6620.7
  Top Copper w6: R1412-1.1@5741.24,2099.51 v1(5774.21,2099.51) 5796.85,2099.51 5809.84,2112.5 R1411-1.1@5834.94,2112.5
  Signal Layer 3 w6: v1(1311.71,2512.01) 1382.78,2583.08 5592.69,2583.08 5813.08,2362.69 5813.08,2138.38 v1(5774.21,2099.51)
  Bot Copper w6: X402.9@750,1425 749.21,1524.51 761.71,1537.01 1124.21,1537.01 1136.71,1549.51 1136.71,2099.51 1149.21,2112.01 1299.21,2112.01 1311.71,2124.51 v1(1311.71,2512.01)
PRIMARY-GPIO4: IC1400-1.32 R1414-1.2 R1417-1.2 | length 382.5
  Top Copper w6: IC1400-1.32@5462.79,2082.38 5462.79,2026.34 5549.13,1940 5630,1940 5664.51,1974.51 R1414-1.2@5684.15,1974.51 R1417-1.2@5684.15,1919.51
PRIMARY-GPIO4-OPT: R1414-1.1 X402.11 | length 6800.6
  Top Copper w6: R1414-1.1@5739.27,1974.51 5739.27,1996.23 5755.05,2012.01 v1(5774.21,2012.01)
  Signal Layer 3 w6: v1(1286.71,2487.01) 1286.71,2517.88 1361.91,2593.08 5596.84,2593.08 5823.08,2366.84 5823.08,2060.88 v1(5774.21,2012.01)
  Bot Copper w6: X402.11@650,1425 649.21,1537.01 661.71,1549.51 1111.71,1549.51 1124.21,1562.01 1124.21,2112.01 1136.71,2124.51 1274.21,2124.51 1286.71,2137.01 v1(1286.71,2487.01)
PRIMARY-GPIO5: IC1400-1.33 R1418-1.2 R1420-1.2 | length 437.7
  Top Copper w6: IC1400-1.33@5443.11,2082.38 5443.11,2026.89 5540,1930 5625.38,1930 5684.15,1871.23 R1418-1.2@5684.15,1849.51 R1420-1.2@5684.15,1794.51
PRIMARY-GPIO5-OPT: R1418-1.1 X402.13 | length 7040.7
  Top Copper w6: R1418-1.1@5739.27,1849.51 5739.27,1871.23 5761.79,1893.75 v1(5768.75,1893.75)
  Signal Layer 3 w6: v1(1261.71,2512.01) 1352.78,2603.08 5600.98,2603.08 5834.33,2369.73 5834.33,1959.33 v1(5768.75,1893.75)
  Bot Copper w6: X402.13@550,1425 549.21,1549.51 561.71,1562.01 1099.21,1562.01 1112.77,1575.57 1112.77,2125.27 1124.51,2137.01 1249.21,2137.01 1261.71,2149.51 v1(1261.71,2512.01)
PRIMARY-ICMP: IC1400-1.46 R1419-1.2 R1421-1.1 | length 246.9
  Top Copper w6: IC1400-1.46@5187.2,2082.38 5187.2,2123.79 5158.59,2152.4 R1419-1.2@5158.59,2234.45 5162.53,2234.45 5177.12,2249.04 5177.12,2255.78 5210.9,2289.57 R1421-1.1@5214.84,2289.57
PRIMARY-ICMP1: IC1400-2.46 R1420-2.2 R1421-2.1 | length 246.9
  Top Copper w6: IC1400-2.46@3087.2,2082.38 3087.2,2123.79 3058.59,2152.4 R1420-2.2@3058.59,2234.45 3062.53,2234.45 3086.78,2258.7 3086.78,2265.44 3110.9,2289.57 R1421-2.1@3114.84,2289.57
PRIMARY-IN+: TP1407-1.1 TR1400-1.4 X500.1 | length 292.8
  Top Copper w10: TR1400-1.4@1833.9,478.35 1833.9,440.6 1837.5,437 TP1407-1.1@1837.5,362.5 1837.5,338.82 1907.89,268.43 X500.1@1960.13,268.43
PRIMARY-IN-: TR1400-1.6 X500.2 | length 105.1
  Top Copper w10: X500.2@1960.13,386.42 1960.13,408.83 1991.9,440.6 TR1400-1.6@1991.9,478.35
PRIMARY-IN_N1: IC1400-1.41 R1422-1.2 TR1400-1.7 | length 3930.9
  Top Copper w10: R1422-1.2@1965.06,1100 1995,1100 ; TR1400-1.7@1991.9,1020.85 1991.9,1096.9 1995,1100 ; v1(2032.01,1100) 1995,1100 ; IC1400-1.41@5285.63,2088.68 5285.63,2013.09 v1(5286.71,2012.01)
  Signal Layer 3 w10: v1(2032.01,1100) 2099.59,1167.58 2559.87,1167.58 2560.2,1167.25 2571.05,1167.25 2571.38,1167.58 2591.12,1167.58 2591.45,1167.25 2654.75,1167.25 2763.29,1275.79 4675.79,1275.79 5180.9,1780.9 5180.9,1906.2 v1(5286.71,2012.01)
PRIMARY-IN_P1: IC1400-1.42 R1422-1.1 TR1400-1.9 | length 4026.7
  Top Copper w10: TR1400-1.9@1833.9,1020.85 1857.9,1020.85 1875,1037.95 1875,1061.12 1909.94,1096.06 R1422-1.1@1909.94,1100 1909.94,1122.44 1918.75,1131.25 1993.75,1131.25 v1(2000,1125) ; v1(5254,2024) 5254,2029.3 5265.94,2041.24 IC1400-1.42@5265.94,2088.68
  Signal Layer 3 w10: v1(2000,1125) 2033.8,1125 2090.38,1181.58 2596.92,1181.58 2597.24,1181.25 2644.54,1181.25 2757.04,1293.75 4672.3,1293.75 5166.9,1788.36 5166.9,1916.9 5254,2004 v1(5254,2024)
PRIMARY-MUX-DATA_TEMP: C111-1.2 R116-1.2 R1406-1.1 | length 2573.7
  Top Copper w10: R116-1.2@4236.03,1006.25 4318.75,1006.25 v1(4375,950) ; R1406-1.1@5739.27,2294.51 5739.27,2316.23 5741.04,2318 5741.04,2337.51 C111-1.2@5741.24,2337.51 ; R1406-1.1@5741.24,2294.51 5769.21,2294.51 v1(5774.21,2299.51)
  Signal Layer 2 w10: v1(4375,950) 4468.75,950 5050,1531.25 5050,2143.75 5131.25,2225 5725,2225 5775,2275 5775,2298.72 v1(5774.21,2299.51)
PRIMARY-MUX-DATA_USER: C115-1.2 R118-1.2 R1410-1.1 | length 5252.3
  Top Copper w6: R118-1.2@1033.81,2593.75 C115-1.2@1085.77,2593.75 1085.77,2654.82 v1(1099.21,2668.26) ; R1410-1.1@5741.24,2169.51 5769.21,2169.51 v1(5774.21,2174.51)
  Signal Layer 2 w6: v1(1099.21,2668.26) 5582.1,2668.26 5809.21,2441.15 5809.21,2209.51 v1(5774.21,2174.51)
PRIMARY-OPA_TEMP: IC100-1.8 R117-1.1 U100-1.3 | length 338.4
  Top Copper w10: IC100-1.8@4021.41,945.82 4081.79,945.82 4096.5,931.1 U100-1.3@4143.86,931.1 4143.86,901.51 4184.35,861.02 4184.35,813.06 4234.61,762.8 R117-1.1@4234.61,758.86
PRIMARY-OPA_USER: IC101-1.8 IC102-1.8 R119-1.1 U101-1.3 | length 1436.6
  Top Copper w6: IC102-1.8@465.16,2627.07 411.2,2627.07 373.17,2589.04 373.17,2569.13 396.92,2545.38 396.92,2428.46 430.38,2395 770,2395 ; IC101-1.8@852.66,2627.07 802.07,2627.07 763.17,2588.17 763.17,2562.69 770,2555.87 770,2395 ; v1(983.17,2412.5) 973.42,2422.24 U101-1.3@973.42,2447.6 943.83,2447.6 891.23,2395 770,2395 ; v1(1081.25,2485) 1115.8,2485 1143.36,2512.56 R119-1.1@1147.29,2512.56
  Signal Layer 2 w6: v1(983.17,2412.5) 1008.75,2412.5 v1(1081.25,2485)
PRIMARY-OUT+: TP1406-1.1 TR1400-1.1 X501.1 | length 294.9
  Top Copper w10: TR1400-1.1@1596.9,478.35 1596.9,396.9 TP1406-1.1@1562.5,362.5 1562.5,327.5 1621.57,268.43 X501.1@1667.87,268.43
PRIMARY-OUT-: TR1400-1.3 X501.2 | length 153.4
  Top Copper w10: X501.2@1667.87,386.42 1711.22,386.42 1754.9,430.1 TR1400-1.3@1754.9,478.35
PRIMARY-OUT_N1: IC1400-1.47 R1423-1.2 TR1400-1.10 | length 4209.7
  Top Copper w10: v1(1687.5,1137.5) 1687.5,1131.66 1677.56,1121.72 R1423-1.2@1677.56,1100 1695.34,1100 1710,1085.34 1710,1030 1719.15,1020.85 TR1400-1.10@1754.9,1020.85 ; v1(5161.71,2012.01) 5167.52,2017.82 IC1400-1.47@5167.52,2088.68
  Signal Layer 3 w10: v1(1687.5,1137.5) 1748.5,1198.5 2624.21,1198.5 2744.46,1318.75 4656.25,1318.75 5141.74,1804.24 5141.74,1970.08 5161.71,1990.06 v1(5161.71,2012.01)
PRIMARY-OUT_P1: IC1400-1.48 R1423-1.1 TR1400-1.12 | length 4197.2
  Top Copper w10: TR1400-1.12@1596.9,1020.85 1596.9,1096.9 1600,1100 R1423-1.1@1622.44,1100 1622.44,1122.44 v1(1637.5,1137.5) ; v1(5136.71,2037.01) 5140.68,2040.98 5147.83,2040.98 IC1400-1.48@5147.83,2082.38
  Signal Layer 3 w10: v1(1637.5,1137.5) 1712.5,1212.5 2612.5,1212.5 2737.5,1337.5 4650,1337.5 5125.99,1813.49 5125.99,2026.29 v1(5136.71,2037.01)
PRIMARY-SCL_0: IC100-1.1 IC101-1.1 IC102-1.1 IC800-1.6 IC801-1.4 R1416-1.1 R1420-1.1 TP1405-1.1 U700-1.14 | length 11683.6
  Top Copper w6: IC102-1.1@465.16,2447.93 516.93,2447.93 531,2462 531,2599.37 558,2626.37 v1(558,2671) ; IC101-1.1@852.66,2447.93 922.93,2447.93 927.81,2452.81 927.81,2672.19 v1(925,2675) ; IC801-1.4@4940.26,2424.9 4917.67,2424.9 4905.52,2412.75 4905.52,2330.68 4924.21,2311.98 4993.48,2311.98 5024.21,2281.25 v1(5024.21,2218.75) ; TP1405-1.1@5861.71,2049.51 v1(5887.22,2024)
  Top Copper w10: U700-1.14@3287.8,661.61 3327.65,661.61 v1(3337.5,671.46) ; IC100-1.1@4021.41,766.68 4084.52,766.68 v1(4085.73,765.47) ; R1420-1.1@5739.27,1794.51 5775.42,1794.51 5777.49,1792.44 R1416-1.1@5799.21,1792.44 R1416-1.1@5803.15,1792.44 ; v1(5817.96,1755.76) 5817.74,1755.98 5817.74,1777.85 R1416-1.1@5803.15,1792.44 ; IC800-1.6@5881.2,1900 v1(5840.98,1900) 5841.56,1899.42 5841.56,1830.86 R1416-1.1@5803.15,1792.44
  Signal Layer 3 w6: v1(558,2671) 562,2675 v1(925,2675) 968.75,2631.25 5706.3,2631.25 ; v1(5024.21,2218.75) 5097.96,2145 5190.87,2145 5409.04,1926.83 5691.92,1926.83 5746.83,1871.92 5778.17,1871.92 5806.33,1900.08 5840.9,1900.08 v1(5840.98,1900)
  Signal Layer 3 w10: v1(3337.5,671.46) 3313.67,647.63 3313.67,627.14 3327.63,613.18 4018.64,613.18 4111.71,706.25 4111.71,739.49 v1(4085.73,765.47) 4085.73,784.17 4109.56,807.99 4109.56,988.59 4160.98,1040 4556.25,1040 5272.01,1755.76 v1(5817.96,1755.76) 5819.98,1755.76 5819.98,1757.78 5886.17,1823.97 v1@5886.17,2020.08 ; 5706.3,2631.25 5886.17,2451.38 5886.17,2203.77 5886.33,2203.62 5886.33,2183.88 5886.17,2183.73 v1@5886.17,2024
PRIMARY-SDA_0: IC100-1.3 IC101-1.3 IC102-1.3 IC800-1.5 IC801-1.5 R1415-1.1 R1417-1.1 TP1404-1.1 U700-1.15 | length 11081.5
  Top Copper w6: IC102-1.3@465.16,2499.11 505.57,2499.11 514.3,2507.84 514.3,2620.3 v1(524,2630) ; IC101-1.3@852.66,2499.11 893.07,2499.11 900,2506.04 v1(900,2650) ; IC801-1.5@4940.26,2350.1 4984.41,2350.1 5063,2271.51 v1(5063,2218.75) ; v1(5771.89,1950) 5790.22,1950 5800,1940.22 R1415-1.1@5800,1922.44 5778.28,1922.44 5777.79,1921.95
  Top Copper w10: U700-1.15@3287.8,636.02 3336.51,636.02 v1(3337.5,637.01) ; IC100-1.3@4021.41,817.86 v1(4085.73,817.86) ; R1417-1.1@5739.27,1919.51 5775.35,1919.51 5777.79,1921.95 5779.67,1923.83 5831.24,1923.83 5840,1932.59 5840,1950 ; v1(5861.71,1999.51) 5840,1977.8 5840,1950 ; TP1404-1.1@5861.71,2162.01 5861.71,2192.96 v1(5862.5,2193.75) ; IC800-1.5@5881.2,1950 5840,1950
  Signal Layer 3 w6: v1(524,2630) 642.88,2630 662.88,2650 v1(900,2650) 931.25,2618.75 5696.24,2618.75 ; v1(5063,2218.75) 5116.08,2165.67 5252.54,2165.67 5361.83,2056.39 5361.83,2013.16 5387.98,1987.01 5731.74,1987.01 5768.75,1950 v1(5771.89,1950)
  Signal Layer 3 w10: v1(3337.5,637.01) 3337.86,636.65 3979.28,636.65 4055.12,712.5 4055.12,787.25 v1(4085.73,817.86) 4085.73,995.13 4150.79,1060.18 4541.43,1060.18 5269.43,1788.18 5806.93,1788.18 5864.81,1846.06 5864.81,1996.41 v1(5861.71,1999.51) 5862.5,2000.3 v1(5862.5,2193.75) 5862.5,2452.49 5696.24,2618.75
PRIMARY-SWTEN: IC1400-1.36 R1402-1.1 R1403-1.2 | length 211.1
  Top Copper w6: IC1400-1.36@5384.05,2082.38 5384.05,2209.96 5377.34,2216.67 R1403-1.2@5377.34,2234.45 5399.06,2234.45 R1402-1.1@5433.59,2234.45
PRIMARY-SWTEN1: IC1400-2.36 R1402-2.1 R1403-2.2 | length 211.1
  Top Copper w10: IC1400-2.36@3284.05,2082.38 3284.05,2209.96 3277.34,2216.67 R1403-2.2@3277.34,2234.45 3311.87,2234.45 R1402-2.1@3333.59,2234.45
PRIMARY-T-SENSOR_0: R107-1.1 R108-1.2 X201.1 | length 472.4
  Top Copper w10: R108-1.2@4081.25,528.69 4250.98,528.69 4277.56,502.11 R107-1.1@4277.56,475 4277.56,471.06 4260.92,454.42 4260.92,327.52 X201.1@4201.83,268.43
PRIMARY-T-SENSOR_1: R103-1.1 R109-1.2 X201.2 | length 413.4
  Top Copper w10: R109-1.2@4018.75,528.69 4022.69,528.69 4045.13,506.25 4063.5,506.25 4063.84,505.91 4150.88,505.91 4158.81,497.98 R103-1.1@4158.81,475 4158.81,471.06 4143.75,456 4143.75,328.34 X201.2@4083.84,268.43
PRIMARY-T-SENSOR_2: R106-1.1 R110-1.2 X201.3 | length 345.7
  Top Copper w10: R110-1.2@3956.25,528.69 3960.19,528.69 3984.94,503.94 4015.06,503.94 4040.06,478.94 R106-1.1@4040.06,475 4040.06,471.06 4025,456 4025,327.58 X201.3@3965.85,268.43